# EAGLE board Teen Mom PCB (EAGLE 9.7.0)
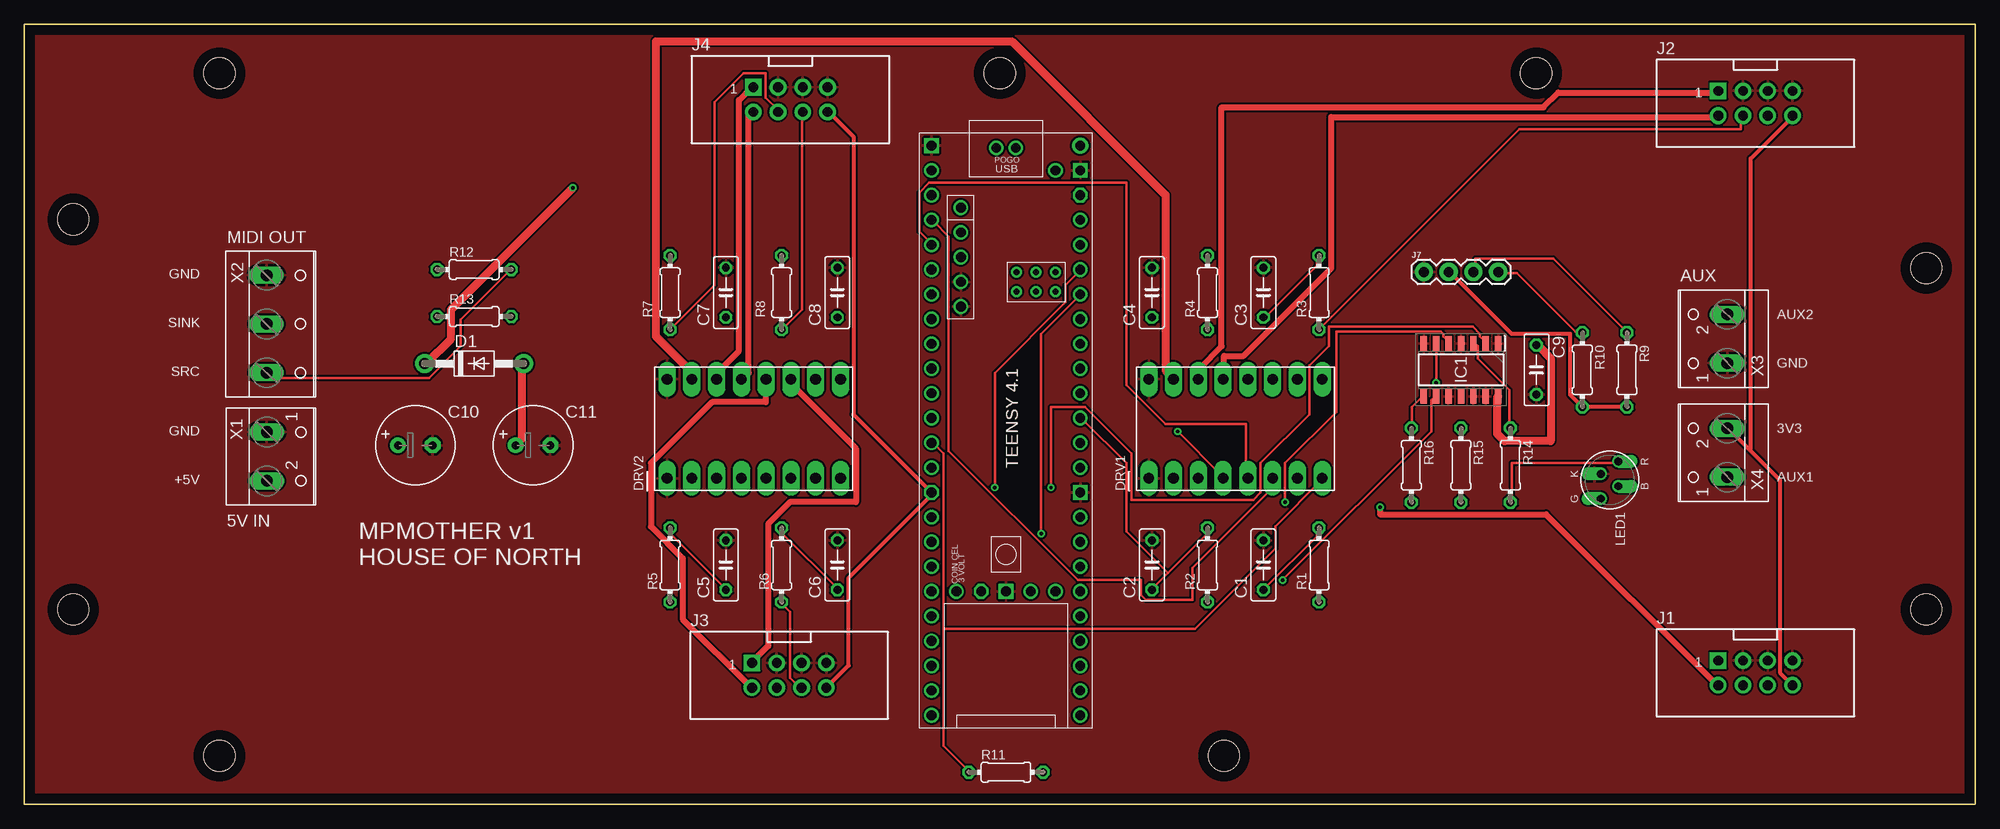
[diagram p0: board, top side]
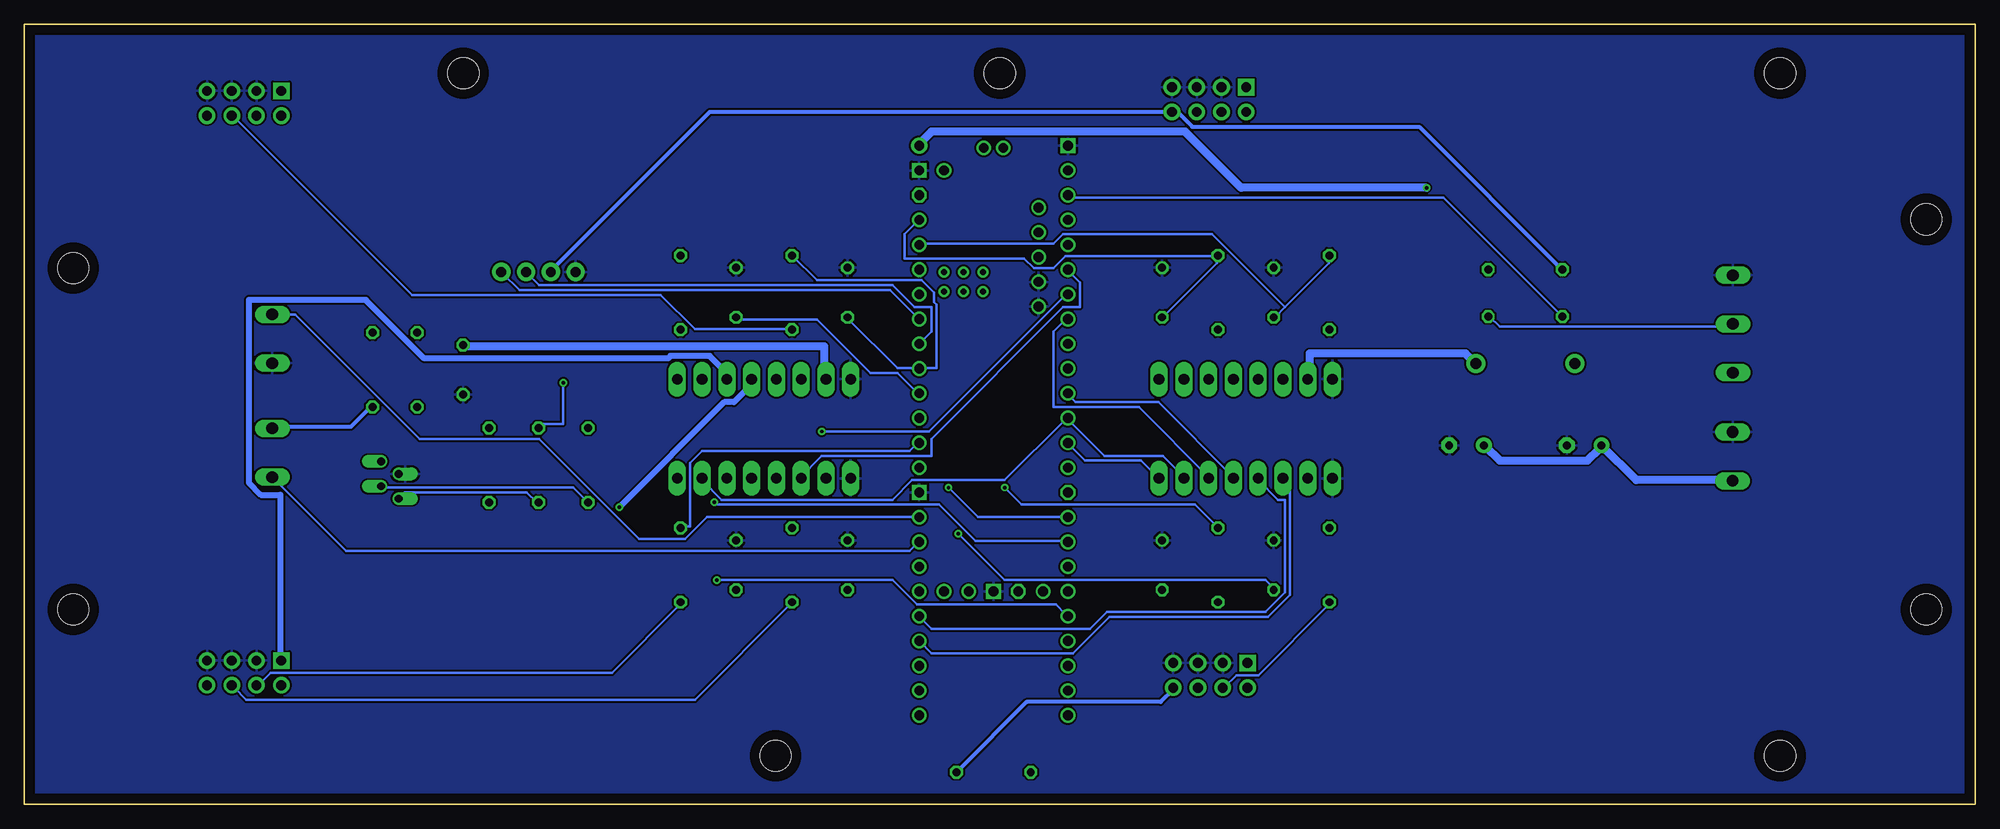
[diagram p1: board, bottom side, seen from below]

Size 200 x 80 mm. Coordinates in mm from the lower left corner, seen from the top.
Outline: 0,80 200,80 200,0 0,0 0,80
Copper layers (1*16): Top 0.035mm / dielectric 1.5mm / Bottom 0.035mm
Design rules "Fusion Electronics Design Rules": minimum track width 6mil, minimum drill 0.35mm, track to track 6mil, track to pad 6mil, pad to pad 6mil, via to via 6mil, smd to smd 6mil, copper to edge 40mil, drill to drill 6mil, minimum pad ring 10mil, minimum via ring 8mil, stop-mask expansion 4mil, vias tented up to drill 32mil, thermal gap 10mil
Net classes: 0 default: width 0.25 mm, clearance 0.2 mm; 1 POWER: width 0.8 mm, clearance 0.25 mm; 2 MOTOR: width 0.6 mm, clearance 0.25 mm; 3 SUPPLY: width 0.4 mm, clearance 0.2 mm
Holes 3.2 mm at 5,60 20,75 155,75 195,55 195,20 123,5 20,5 5,20 100,75

## Footprints (pad centres in the part's own frame; a part is rotated, then mirrored left to right if it is on the bottom)
C050-025X075 = drill 0.813 octagon: 1 -2.54,0; 2 2.54,0
E3,5-8 = drill 0.813 pad 1.6: + -1.778,0 | drill 0.813 pad 1.6 octagon: - 1.778,0
DO41-10 = drill 1.118 pad 1.93: A 5.08,0; C -5.08,0
POLOLU_2130_FH = drill 1.1 pad 1.8 long: AIN1 -5.08,-3.81; AIN2 -5.08,-1.27; AISEN 5.08,-6.35; AOUT1 5.08,-3.81; AOUT2 5.08,-1.27; BIN1 -5.08,3.81; BIN2 -5.08,1.27; BISEN 5.08,-8.89; BOUT1 5.08,3.81; BOUT2 5.08,1.27; GND@1 -5.08,8.89; GND@2 5.08,8.89; NFAULT -5.08,-8.89; NSLEEP -5.08,-6.35; VIN 5.08,6.35; VMM -5.08,6.35
SOIC127P600X175-14N = smd 1.525 x 0.65: 1 -2.712,3.81; 2 -2.712,2.54; 3 -2.712,1.27; 4 -2.712,0; 5 -2.712,-1.27; 6 -2.712,-2.54; 7 -2.712,-3.81; 8 2.712,-3.81; 9 2.712,-2.54; 10 2.712,-1.27; 11 2.712,0; 12 2.712,1.27; 13 2.712,2.54; 14 2.712,3.81
BOXHDR_2X4_V = drill 1 pad 1.7 square: 1 -3.81,1.27 | drill 1 pad 1.7: 2 -3.81,-1.27; 3 -1.27,1.27; 4 -1.27,-1.27; 5 1.27,1.27; 6 1.27,-1.27; 7 3.81,1.27; 8 3.81,-1.27
1X04 = drill 1.016 pad 1.88: 1 0,0; 2 2.54,0; 3 5.08,0; 4 7.62,0
LED5MM_RGB_4L_STAGGER = drill 0.8 pad 1.3 offset: 1 -1.905,0.9; 2 -0.635,-0.9; 3 0.635,0.9; 4 1.905,-0.9
0204/7 = drill 0.813 octagon: 1 -3.81,0; 2 3.81,0
TEENSY41 = drill 1: 0-RX1/CS1/CRX2 -27.94,-7.62; 1-TX1/MISO1/CTX2 -25.4,-7.62; 2-OUT2 -22.86,-7.62; 3-LRCLK2 -20.32,-7.62; 4-BCLK2 -17.78,-7.62; 5-IN2 -15.24,-7.62; 6-OUT1D -12.7,-7.62; 7-RX2/OUT1A -10.16,-7.62; 8-TX2/IN1 -7.62,-7.62; 9-OUT1C -5.08,-7.62; 10-CS\MQSR -2.54,-7.62; 11-MOSI/CTX1 0,-7.62; 12-MISO/MQSL 2.54,-7.62; 13-SCK/LED 2.54,7.62; 14-A0/TX3/SPDIF_OUT 0,7.62; 15-A1/RX3/SPDIF_IN -2.54,7.62; 16-A2/RX4/SCL1 -5.08,7.62; 17-A3/TX4/SDA1 -7.62,7.62; 18-A4/SDA0 -10.16,7.62; 19-A5/SCL0 -12.7,7.62; 20-A6/TX5/LRCLK1 -15.24,7.62; 21-A7/RX5/BCLK1 -17.78,7.62; 22-A8/CTX1 -20.32,7.62; 23-A9/CRX1/MCLK1 -22.86,7.62; 24-A10/TX6/SCL2 7.62,-7.62; 25-A11/RX6/SDA2 10.16,-7.62; 26-A12/MOSI1 12.7,-7.62; 27-A13/SCK1 15.24,-7.62; 28-RX7 17.78,-7.62; 29-TX7 20.32,-7.62; 30-CRX3 22.86,-7.62; 31-CTX3 25.4,-7.62; 32-OUT1B 27.94,-7.62; 33-MCLK2 27.94,7.62; 34-RX8 25.4,7.62; 35-TX8 22.86,7.62; 36-PWM 20.32,7.62; 37-PWM 17.78,7.62; 38-A14/CS/IN1 15.24,7.62; 39-A15/CS/OUT1A 12.7,7.62; 40-A16/CS1 10.16,7.62; 41-A17/MISO1 7.62,7.62; +5V -24.13,-4.62; D+ -30.25,-1; D- -30.25,1; DM -21.59,-4.62; DP -19.05,-4.62; GND4 -16.51,-4.62; GND5 -13.97,-4.62; ON/OFF 15.24,5.08; PROGRAM 15.24,2.54; VBAT 15.24,-5.08; VUSB -27.94,5.08 | drill 1 octagon: 3V3-1 5.08,-7.62; 3V3-2 15.24,-2.54; 3V3-3 -25.4,7.62 | drill 0.6: G -15.51,3.08; LED -17.51,3.08; R+ -17.51,5.08; R- -15.51,5.08; T+ -15.51,1.08; T- -17.51,1.08 | drill 1 square: GND1 -30.48,-7.62; GND2 15.24,0; GND3 5.08,7.62; GND6 -27.94,7.62 | drill 1 pad 1.676: VIN -30.48,7.62
W237-102 = drill 1.194 long: 1 -2.5,-1.27; 2 2.5,-1.27
W237-103 = drill 1.194 long: 1 -5,-1.29; 2 0,-1.29; 3 5,-1.29

## Placement (x,y rotation side)
C1  100nF  [C050-025X075]  127.03,24.55 90 top
C2  100nF  [C050-025X075]  115.6,24.55 90 top
C3  100nF  [C050-025X075]  127.03,52.49 90 top
C4  100nF  [C050-025X075]  115.6,52.49 90 top
C5  100nF  [C050-025X075]  71.92,24.55 90 top
C6  100nF  [C050-025X075]  83.35,24.55 90 top
C7  100nF  [C050-025X075]  71.92,52.49 90 top
C8  100nF  [C050-025X075]  83.35,52.49 90 top
C9  100nF  [C050-025X075]  155.03,44.57 270 top
C10  100uF 25V  [E3,5-8]  40.08,36.83 0 top
C11  100uF 25V  [E3,5-8]  52.15,36.83 0 top
D1  1N5819  [DO41-10]  46.11,45.21 0 top
DRV1  DRV TEXTURE+SHADOW  [POLOLU_2130_FH]  124.17,38.52 90 top
DRV2  DRV SPACE+MOVEMENT  [POLOLU_2130_FH]  74.78,38.52 90 top
IC1  SN74AHCT125DR  [SOIC127P600X175-14N]  147.29,44.57 270 top
J1  SHADOW  [BOXHDR_2X4_V]  177.47,13.49 0 top
J2  TEXTURE  [BOXHDR_2X4_V]  177.47,71.91 0 top
J3  MOVEMENT  [BOXHDR_2X4_V]  78.41,13.23 0 top
J4  SPACE  [BOXHDR_2X4_V]  78.54,72.29 0 top
J7  QWIIC  [1X04]  143.48,54.61 0 top
LED1  L-154A4SURKQBDZGW  [LED5MM_RGB_4L_STAGGER]  162.53,33.27 270 top
R1  1k  [0204/7]  132.74,24.55 90 top
R2  1k  [0204/7]  121.31,24.55 90 top
R3  1k  [0204/7]  132.74,52.49 90 top
R4  1k  [0204/7]  121.31,52.49 90 top
R5  1k  [0204/7]  66.2,24.55 90 top
R6  1k  [0204/7]  77.63,24.55 90 top
R7  1k  [0204/7]  66.2,52.49 90 top
R8  1k  [0204/7]  77.63,52.49 90 top
R9  4.7k  [0204/7]  164.31,44.57 270 top
R10  4.7k  [0204/7]  159.73,44.57 270 top
R11  10k  [0204/7]  100.63,3.3 0 top
R12  33R  [0204/7]  46.11,54.86 0 top
R13  10R  [0204/7]  46.11,50.04 0 top
R14  330R  [0204/7]  152.37,34.79 270 top
R15  180R  [0204/7]  147.29,34.79 270 top
R16  180R  [0204/7]  142.21,34.79 270 top
U$1  TEENSY41  [TEENSY41]  100.64,37.08 270 top
X1  [W237-102]  26.13,35.69 270 top
X2  [W237-103]  26.13,49.28 270 top
X3  [W237-102]  173.32,47.75 90 top
X4  [W237-102]  173.32,36.07 90 top

## Library data of the parts
C1-C11 = rcl; SPICEPREFIX: C
D1 = adafruit lib
DRV1 DRV2 = Pololu_DRV8833_2130
IC1 = SN74AHCT125DR; ARROW_PART_NUMBER: SN74AHCT125DR; ARROW_PRICE-STOCK: https://www.arrow.com/en/products/sn74ahct125dr/texas-instruments.html?utm_currency=USD&region=europe; DESCRIPTION: Quadruple Bus Buffer Gates With 3-State Outputs; HEIGHT: 1.75mm; MANUFACTURER_NAME: Texas Instruments; MANUFACTURER_PART_NUMBER: SN74AHCT125DR; MOUSER_PART_NUMBER: 595-SN74AHCT125DR; MOUSER_PRICE-STOCK: https://www.mouser.co.uk/ProductDetail/Texas-Instruments/SN74AHCT125DR?qs=B7lSdIxWQkm9VQkJOjfRaA%3D%3D
J1-J4 = Motorpot_custom
J7 = Qwiic4
LED1 = Kingbright_L154A4_RGB_CC
R1-R16 = rcl; SPICEPREFIX: R
U$1 = teensy lib
X1 X3 X4 = con-wago-500 terminal
X2 = con-wago-500 terminal; MPN: 237-103; OC_FARNELL: unknown; OC_NEWARK: 18M7116

## Nets
3V3 [SUPPLY]: J1.8 J2.8 J3.8 J4.8 J7.2 R9.2 R10.2 R11.2 R12.1 U$1.3V3-1 X4.2
5V [POWER]: C9.1 C10.+ C11.+ D1.A DRV1.VIN DRV2.VIN IC1.14 X1.2
AUX1: U$1.40-A16/CS1 X4.1
AUX2: U$1.41-A17/MISO1 X3.2
CH1_IN1: DRV1.AIN1 U$1.2-OUT2
CH1_IN2: DRV1.AIN2 U$1.3-LRCLK2
CH1_MOT+ [MOTOR]: DRV1.AOUT1 J1.1
CH1_MOT- [MOTOR]: DRV1.AOUT2 J1.2
CH1_POTA: J1.4 R1.1
CH1_POTB: J1.6 R2.1
CH1_WA: C1.1 R1.2 U$1.14-A0/TX3/SPDIF_OUT
CH1_WB: C2.1 R2.2 U$1.15-A1/RX3/SPDIF_IN
CH2_IN1: DRV1.BIN1 U$1.4-BCLK2
CH2_IN2: DRV1.BIN2 U$1.5-IN2
CH2_MOT+ [MOTOR]: DRV1.BOUT1 J2.1
CH2_MOT- [MOTOR]: DRV1.BOUT2 J2.2
CH2_POTA: J2.4 R3.1
CH2_POTB: J2.6 R4.1
CH2_WA: C3.1 R3.2 U$1.16-A2/RX4/SCL1
CH2_WB: C4.1 R4.2 U$1.17-A3/TX4/SDA1
CH3_IN1: DRV2.AIN1 U$1.6-OUT1D
CH3_IN2: DRV2.AIN2 U$1.9-OUT1C
CH3_MOT+ [MOTOR]: DRV2.AOUT1 J3.1
CH3_MOT- [MOTOR]: DRV2.AOUT2 J3.2
CH3_POTA: J3.4 R5.1
CH3_POTB: J3.6 R6.1
CH3_WA: C5.1 R5.2 U$1.20-A6/TX5/LRCLK1
CH3_WB: C6.1 R6.2 U$1.21-A7/RX5/BCLK1
CH4_IN1: DRV2.BIN1 U$1.36-PWM
CH4_IN2: DRV2.BIN2 U$1.37-PWM
CH4_MOT+ [MOTOR]: DRV2.BOUT1 J4.1
CH4_MOT- [MOTOR]: DRV2.BOUT2 J4.2
CH4_POTA: J4.4 R7.1
CH4_POTB: J4.6 R8.1
CH4_WA: C7.1 R7.2 U$1.22-A8/CTX1
CH4_WB: C8.1 R8.2 U$1.23-A9/CRX1/MCLK1
DRV_FAULT: DRV1.NFAULT DRV2.NFAULT R11.1 U$1.11-MOSI/CTX1
DRV_SLEEP: DRV1.NSLEEP DRV2.NSLEEP U$1.10-CS\MQSR
GND [SUPPLY]: C1.2 C2.2 C3.2 C4.2 C5.2 C6.2 C7.2 C8.2 C9.2 C10.- C11.- DRV1.GND@1 DRV1.GND@2 DRV2.GND@1 DRV2.GND@2 IC1.1 IC1.4 IC1.7 IC1.10 IC1.12 IC1.13 J1.3 J1.5 J1.7 J2.3 J2.5 J2.7 J3.3 J3.5 J3.7 J4.3 J4.5 J4.7 J7.1 LED1.2 U$1.GND1 U$1.GND2 U$1.GND3 U$1.GND4 U$1.GND5 U$1.GND6 X1.1 X2.1 X3.1
LED_B: LED1.3 R16.2
LED_B_DRV: IC1.8 R16.1
LED_B_IN: IC1.9 U$1.28-RX7
LED_G: LED1.4 R15.2
LED_G_DRV: IC1.6 R15.1
LED_G_IN: IC1.5 U$1.25-A11/RX6/SDA2
LED_R: LED1.1 R14.2
LED_R_DRV: IC1.3 R14.1
LED_R_IN: IC1.2 U$1.24-A10/TX6/SCL2
MIDI_SINK: R13.2 X2.2
MIDI_SRC: R12.2 X2.3
MIDI_TX: R13.1 U$1.1-TX1/MISO1/CTX2
SCL: J7.4 R10.1 U$1.19-A5/SCL0
SDA: J7.3 R9.1 U$1.18-A4/SDA0
VIN [POWER]: D1.C U$1.VIN

## Tracks (layer width: path | path; a pad name or v marks a point on that pad's centre or on a via)
3V3
  Top 0.4: R9.2 164.25,40.75 159.75,40.75 R10.2 159.5,41 158.5,42 158.5,48.25 152.5,48.25 146.25,54.5 J7.2 | 176.88,36.38 174.75,38.5 X4.2 | 176.88,36.38 180,33.25 180,13.5 181.25,12.25 J1.8 | J2.8 181.25,70.5 177,66.25 177,36.5 176.88,36.38 | J3.8 82.25,12 84.5,14.25 84.5,23.25 93,31.75 U$1.3V3-1 93,32 85,40 85,68.5 82.5,71 J4.8
  Bottom 0.4: R9.2 164.5,40.75 166.5,38.75 174.5,38.75 X4.2 | R11.2 104.25,3.5 97.25,10.5 83.5,10.5 82.25,11.75 J3.8 | R12.1 42.5,55 57,69.5 80.25,69.5 81.75,71 82.25,71 J4.8 82.5,71 129.75,71 146,54.75 J7.2
5V
  Top 0.8: IC1.14 151,41.75 151,38 151.75,37.25 156.5,37.25 156.5,45.75 155.25,47 C9.1 | C11.+ 50.5,37 51,37.5 51,45 D1.A | DRV1.VIN 117.75,43.75 117,44.5 117,62.5 101.25,78.25 64.75,78.25 64.75,48 68.25,44.5 68.25,43.75 DRV2.VIN
  Bottom 0.8: DRV1.VIN 118,43.75 118,47 155,47 C9.1 | X1.2 25,33.25 34.75,33.25 38.25,36.75 C10.+ 38.5,36.5 39.75,35.25 48.75,35.25 50.25,36.75 C11.+ | DRV2.VIN 68.25,43.75 68.25,46.25 52.25,46.25 51.25,45.25 D1.A
AUX1
  Bottom 0.25: U$1.40-A16/CS1 108.5,26.75 109.25,26 167,26 174.5,33.5 X4.1
AUX2
  Bottom 0.25: U$1.41-A17/MISO1 108.5,29.5 130,29.5 132.25,27.25 137,27.25 147.25,37.5 159.5,37.5 172.25,50.25 174.5,50.25 X3.2
CH1_IN1
  Top 0.25: U$1.2-OUT2 93.25,59.75 94.75,58.25 94.75,36.25 108,23 114.5,23 114.5,21.5 115,21 119.75,21 119.75,24.25 127.75,32.25 127.75,33.25 DRV1.AIN1
CH1_IN2
  Top 0.25: U$1.3-LRCLK2 93,57.5 91.75,58.75 91.75,62.75 92.75,63.75 113,63.75 113,43 117,39 125.25,39 125.25,33.5 DRV1.AIN2
CH1_MOT+
  Bottom 0.6: J1.1 173.75,15 173.75,31.75 175.75,31.75 177,33 177,51.75 165,51.75 159,45.75 134,45.75 133.75,46 129.75,46 128,44.25 128,43.75 DRV1.AOUT1
CH1_MOT-  (via drill 0.35)
  Top 0.6: v139,30.5 139,29.75 156,29.75 173.5,12.25 J1.2
  Bottom 0.6: v139,30.5 128.25,41.25 127.25,41.25 125.5,43 125.5,43.5 DRV1.AOUT2
CH1_POTA
  Bottom 0.25: R1.1 132.75,20.5 139.75,13.5 174.75,13.5 176,12.25 J1.4
CH1_POTB
  Bottom 0.25: R2.1 121.5,20.5 131.25,10.75 177.25,10.75 178.5,12 J1.6
CH1_WA
  Top 0.25: C1.1 127.25,22.25 132.5,27.5 132.5,28.25 R1.2
  Bottom 0.25: U$1.14-A0/TX3/SPDIF_OUT 108.5,37 109.25,36.25 130.5,36.25 131.75,35 131.75,28.5 132.5,28.5 R1.2
CH1_WB
  Top 0.25: 117.25,23.75 121.25,27.75 121.25,28.25 R2.2 | 117.25,23.75 115.75,22.25 C2.1 | 117.25,23.75 113,28 113,35 108.5,39.5 U$1.15-A1/RX3/SPDIF_IN
CH2_IN1
  Bottom 0.25: U$1.4-BCLK2 93,54.75 91.75,53.5 91.75,51 93.5,51 107,37.5 107,35.75 118.25,35.75 120.5,33.5 DRV1.BIN1
CH2_IN2  (via drill 0.35)
  Top 0.25: v118.25,38.25 122.75,33.75 122.75,33.5 DRV1.BIN2
  Bottom 0.25: v118.25,38.25 107.25,38.25 93.25,52.25 U$1.5-IN2
CH2_MOT+
  Top 0.6: J2.1 173.5,73 157.25,73 155.75,71.5 122.75,71.5 122.75,47 120.5,44.75 120.5,43.75 DRV1.BOUT1
CH2_MOT-
  Top 0.6: J2.2 173.5,70.5 134,70.5 134,55 125,46 123,46 123,43.75 DRV1.BOUT2
CH2_POTA
  Top 0.25: R3.1 132.75,48.75 153.25,69.25 176,69.25 176,70.5 J2.4
CH2_POTB
  Bottom 0.25: R4.1 121.5,48.75 131.25,48.75 134.75,52.25 160.25,52.25 178.5,70.5 J2.6
CH2_WA
  Top 0.25: C3.1 127.25,50 132.5,55.25 132.5,56.25 R3.2
  Bottom 0.25: U$1.16-A2/RX4/SCL1 108.5,42.25 110.5,44.25 113.25,44.25 118.75,49.75 127,49.75 C3.1
CH2_WB
  Bottom 0.25: C4.1 115.5,49.75 110.5,44.75 108.5,44.75 U$1.17-A3/TX4/SDA1 108.25,44.75 106.5,44.75 106.5,51.25 106.75,51.5 106.75,52.5 108,53.75 118.75,53.75 121.25,56.25 R4.2
CH3_IN1
  Bottom 0.25: U$1.6-OUT1D 93.25,49.75 94.5,48.5 94.5,40.75 85.75,40.75 78.5,33.5 DRV2.AIN1
CH3_IN2
  Bottom 0.25: U$1.9-OUT1C 93,42 92.25,41.25 83.75,41.25 76,33.5 DRV2.AIN2
CH3_MOT+
  Top 0.6: J3.1 74.75,14.75 76.25,16.25 76.25,28.75 78.5,31 85.25,31 85.25,36.5 78.75,43 78.75,43.5 DRV2.AOUT1
CH3_MOT-
  Top 0.6: J3.2 74.5,12 67.5,19 67.5,25.25 64.25,28.5 64.25,35 70.5,41.25 76,41.25 76,43.5 DRV2.AOUT2
CH3_POTA
  Bottom 0.25: R5.1 66.25,20.5 73.5,13.25 75.75,13.25 77,12 J3.4
CH3_POTB
  Top 0.25: R6.1 77.75,20.5 78.5,19.75 78.5,13 79.5,12 J3.6
CH3_WA  (via drill 0.35)
  Top 0.25: C5.1 71.75,22.25 66.25,27.75 66.25,28.25 R5.2 | v104.25,27.75 104.25,48.25 108.25,52.25 U$1.20-A6/TX5/LRCLK1
  Bottom 0.25: v104.25,27.75 99.5,23 72.75,23 72,22.25 C5.1
CH3_WB  (via drill 0.35)
  Top 0.25: C6.1 83.25,22.25 77.75,27.75 77.75,28.25 R6.2 | v99.5,32.5 99.5,44.25 106.75,51.5 106.75,53.25 108.25,54.75 U$1.21-A7/RX5/BCLK1
  Bottom 0.25: v99.5,32.5 97.75,30.75 80,30.75 77.75,28.5 R6.2
CH4_IN1
  Bottom 0.25: U$1.36-PWM 107,15.5 92.5,15.5 88.75,19.25 72.5,19.25 70.25,21.5 70.25,33.25 70.75,33.25 DRV2.BIN1
CH4_IN2
  Bottom 0.25: U$1.37-PWM 108.25,19.25 107,18 90.75,18 89,19.75 72.75,19.75 70.75,21.75 70.75,31.25 71.5,31.25 73.5,33.25 DRV2.BIN2
CH4_MOT+
  Top 0.6: J4.1 74.5,73.5 73.25,72.25 73.25,46.5 71,44.25 71,43.75 DRV2.BOUT1
CH4_MOT-
  Top 0.6: J4.2 74.5,71 74.25,70.75 74.25,44.25 73.75,43.75 DRV2.BOUT2
CH4_POTA
  Top 0.25: R7.1 66.25,48.75 70.75,53.25 70.75,72 73.75,75 76,75 76,72.5 77.25,71.25 J4.4
CH4_POTB
  Top 0.25: R8.1 77.75,48.75 79.75,50.75 79.75,71 J4.6
CH4_WA
  Bottom 0.25: 70.75,51 66.25,55.5 66.25,56.25 R7.2 | 70.75,51 71.75,50 C7.1 | 70.75,51 78.25,58.5 93.5,58.5 94.5,57.5 108.25,57.5 U$1.22-A8/CTX1
CH4_WB
  Bottom 0.25: 77.75,56.25 77.75,55.5 83.25,50 C8.1 | 77.75,56.25 R8.2 77.75,56.25 | 77.75,56.25 93.25,56.25 94.5,55 96.5,55 97.5,56 109.75,56 109.75,58.5 108.5,59.75 U$1.23-A9/CRX1/MCLK1
DRV_FAULT
  Top 0.25: 94.25,18 94.25,36 93.25,37 U$1.11-MOSI/CTX1 | 94.25,18 94.25,6 96.75,3.5 R11.1 | 94.25,18 120,18 128.25,26.25 128.25,28.5 133,33.25 DRV1.NFAULT
  Bottom 0.25: DRV2.NFAULT 83.75,33.5 85.5,35.25 91.25,35.25 93,37 U$1.11-MOSI/CTX1
DRV_SLEEP
  Bottom 0.25: DRV2.NSLEEP 81,33.5 83.25,35.75 89.25,35.75 93,39.5 U$1.10-CS\MQSR 93.25,39.5 99.5,33.25 109,33.25 111,31.25 128.5,31.25 130.5,33.25 DRV1.NSLEEP
GND
  pour Top: -0.97,-4.92 201.97,-4.92 207.92,1.03 207.92,76.97 202.97,81.92 -4.92,81.92 -4.92,-0.97
  pour Bottom: -1.97,-9.92 202.97,-9.92 211.92,-0.97 211.92,74.97 200.97,85.92 -8.92,85.92 -8.92,-2.97
LED_B
  Bottom 0.25: LED1.3 163.25,32.5 143.75,32.5 142.25,31 R16.2
LED_B_DRV
  Top 0.25: IC1.8 143.25,41.75 142.25,40.75 142.25,38.75 R16.1
LED_B_IN  (via drill 0.35)
  Top 0.25: v129,23 144.25,38.25 144.25,41.5 144.5,41.75 IC1.9
  Bottom 0.25: v129,23 111,23 108.5,20.5 94.25,20.5 93.25,19.5 U$1.28-RX7
LED_G
  Bottom 0.25: LED1.4 161.5,31.5 161,32 148.5,32 147.5,31 R15.2
LED_G_DRV  (via drill 0.35)
  Top 0.25: v144.75,43.25 144.75,47.25 IC1.6
  Bottom 0.25: v144.75,43.25 144.75,39 147,39 147.25,38.75 R15.1
LED_G_IN  (via drill 0.35)
  Top 0.25: v129.25,31 129.25,35 134.5,40.25 134.5,48.5 145.25,48.5 145.5,48.25 145.5,48 146,47.5 IC1.5
  Bottom 0.25: v129.25,31 129,30.75 106.25,30.75 102.5,27 93.25,27 U$1.25-A11/RX6/SDA2
LED_R
  Top 0.25: LED1.1 163.25,35 152.5,35 152.5,31 R14.2
LED_R_DRV
  Top 0.25: IC1.3 148.75,47.25 149,47 149,45.75 152.25,42.5 152.25,38.75 R14.1
LED_R_IN  (via drill 0.35)
  Top 0.25: v105.25,32.5 105.25,40.75 108.75,40.75 113.5,36 113.5,31.25 126,31.25 126.75,32 126.75,35 131.75,40 131.75,45 133.75,47 133.75,49 148.5,49 149.25,48.25 149.25,48 149.75,47.5 IC1.2
  Bottom 0.25: v105.25,32.5 102.25,29.5 93.25,29.5 U$1.24-A10/TX6/SCL2
MIDI_SINK
  Bottom 0.25: R13.2 49.75,50 48.75,49 25.25,49 25,49.25 X2.2
MIDI_SRC
  Top 0.25: R12.2 49.75,54.75 44.75,49.75 44.75,47 41.5,43.75 25,43.75 25,44.25 X2.3
MIDI_TX
  Bottom 0.25: R13.1 42.5,50.25 54.5,62.25 93,62.25 U$1.1-TX1/MISO1/CTX2
SCL
  Top 0.25: R10.1 159.5,48.5 159,48.5 153,54.5 151.25,54.5 J7.4
  Bottom 0.25: U$1.19-A5/SCL0 108.5,50 111.25,52.75 149.25,52.75 151,54.5 J7.4
SDA
  Top 0.25: R9.1 164.25,48.5 156.75,56 148.75,56 148.75,54.75 J7.3
  Bottom 0.25: U$1.18-A4/SDA0 107,48.5 107,51 108.75,51 111,53.25 147.25,53.25 148.5,54.5 J7.3
VIN  (via drill 0.35)
  Top 0.8: v56.25,63.25 43.75,50.75 43.75,47.75 41.25,45.25 D1.C
  Bottom 0.8: v56.25,63.25 75.25,63.25 81,69 107,69 108.25,67.75 U$1.VIN

## Text on the board
tPlace: MIDI OUT | GND | AUX | AUX2 | SINK | GND | SRC | GND | 3V3 | +5V | AUX1 | 5V IN | MPMOTHER v1 / HOUSE OF NORTH